# Altium PCB PCB3.PcbDoc
Units mil, origin at the board's own origin, x right, y up, seen from the top; angles counter-clockwise.
Board outline 1574.8 x 984.25 mil, 2 copper layers (Top Layer, Bottom Layer); 6 components, 4 nets, 12 pads, 0 vias.
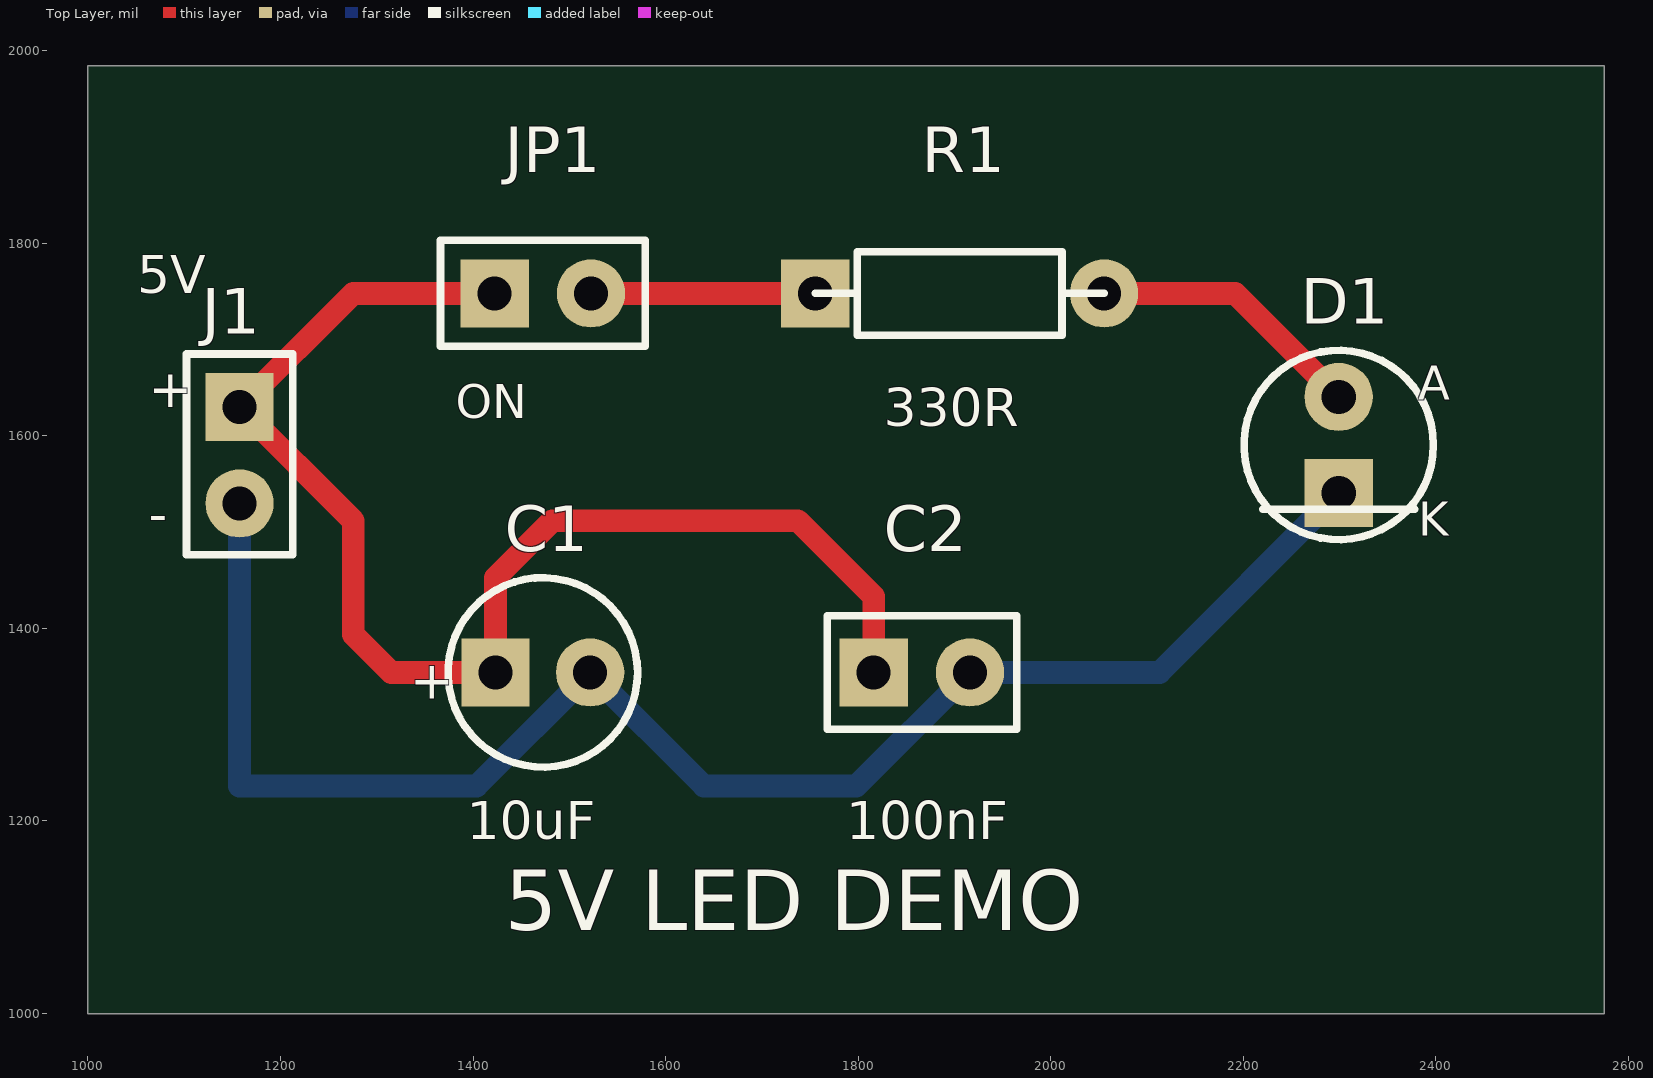
[diagram p0: Top Layer view]
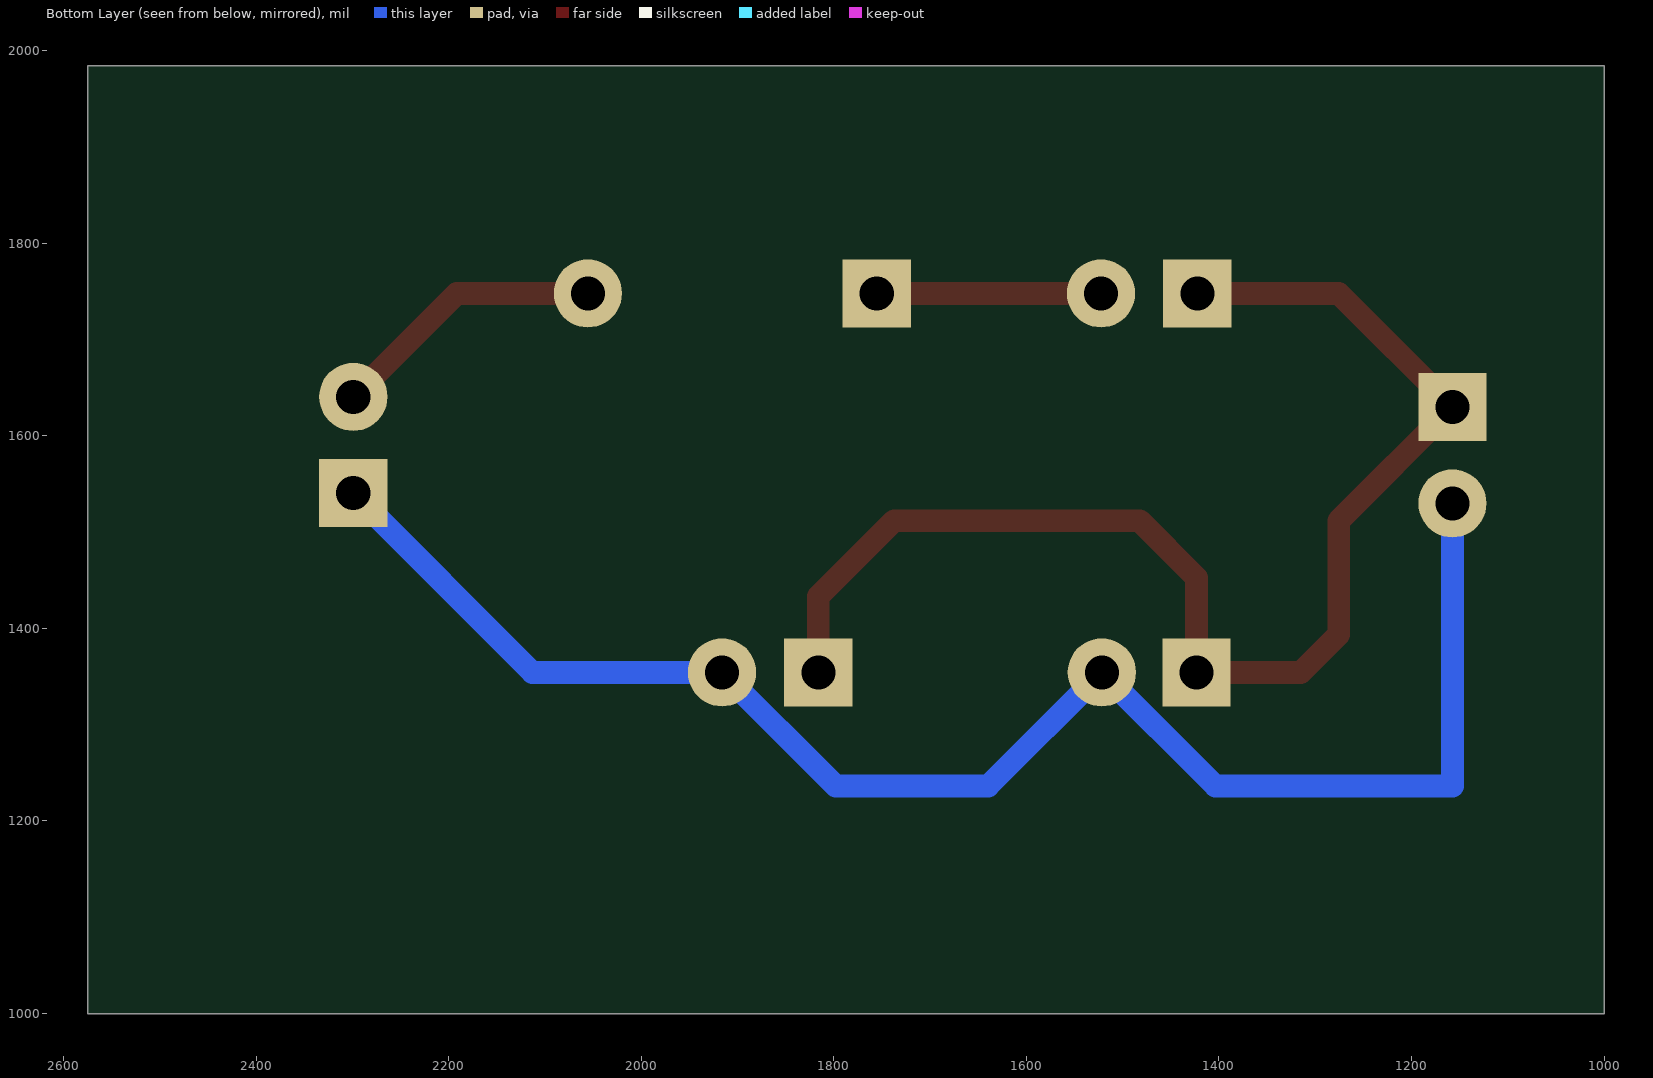
[diagram p1: Bottom Layer view, seen from below]

## Layer stack, top to bottom
Top Solder: solder mask 0.4, Solder Resist, Dk 3.5
Top Layer: signal copper 1.4
Dielectric 1: dielectric 12.6, FR-4, Dk 4.8
Bottom Layer: signal copper 1.4
Bottom Solder: solder mask 0.4, Solder Resist, Dk 3.5

## Board outline
1000,1000 2574.8,1000 2574.8,1984.25 1000,1984.25

## Design rules (kind name [scope] priority, off if disabled: settings)
Clearance [All] p1: gap=10 ignorepadtopadclearanceinfootprint=FALSE except(0: Arc-Hole Track-Hole SMDPad-Hole THPad-Hole Via-Hole Fill-Hole Poly-Hole Region-Hole Text-Hole)
PolygonConnect [All] p1: connectstyle=Relief reliefconductorwidth=10 reliefentries=4 polygonreliefangle="90 Angle" airgapwidth=10
RoutingVias [All] p1: holewidth=28 width=50 viastyle="Through Hole" minholewidth=28 minwidth=50 maxholewidth=28 maxwidth=50
SolderMaskExpansion [All] p1: expansion=4 istentingtop=FALSE
Width [All] p1: maxlimit=10 minlimit=10 preferedwidth=10
30 further rules are at their usual default settings.

## Components (designator, comment, footprint, x,y, rotation, side; value= is the part's Value field where it differs from the comment)
C1 "10uF" CAP_RADIAL_D5_P2.5 1472.44,1354.33 r0 top
C2 "100nF" CAP_DISC_P2.54 1866.14,1354.33 r0 top
D1 "RED LED" LED_D5_P2.54 2299.21,1590.55 r0 top
J1 "5V IN" HDR_1X02_P2.54#1 1157.48,1579.92 r0 top
JP1 "ON/OFF" HDR_1X02_P2.54#2 1472.44,1748.03 r0 top
R1 "330R" R_AXIAL_P7.62 1905.51,1748.03 r0 top

## Footprints (in the part's own frame and the unit in brackets; to place one, negate y for a bottom-side part, rotate by r counter-clockwise, add the part's x,y. Pads: shape width x height; smd on the part's side, far side on the other; paste and mask are expansions set on the pad)
CAP_DISC_P2.54 [mm]
  rect 1.8x1.8 hole 0.9: 1(-1.27,0)
  round 1.8 hole 0.9: 2(1.27,0)
  silkscreen extent -2.5,-1.5 2.5,1.5
CAP_RADIAL_D5_P2.5 [mm]
  rect 1.8x1.8 hole 0.9: 1(-1.25,0)
  round 1.8 hole 0.9: 2(1.25,0)
  silkscreen extent -2.5,-2.5 2.5,2.5
HDR_1X02_P2.54#1 [mm]
  rect 1.8x1.8 hole 0.9: 1(0,1.27)
  round 1.8 hole 0.9: 2(0,-1.27)
  silkscreen extent -1.4,-2.63 1.4,2.67
HDR_1X02_P2.54#2 [mm]
  rect 1.8x1.8 hole 0.9: 1(-1.27,0)
  round 1.8 hole 0.9: 2(1.27,0)
  silkscreen extent -2.7,-1.4 2.7,1.4
LED_D5_P2.54 [mm]
  rect 1.8x1.8 hole 0.9: 1(0,-1.27)
  round 1.8 hole 0.9: 2(0,1.27)
  silkscreen extent -2.5,-2.5 2.5,2.5
R_AXIAL_P7.62 [mm]
  rect 1.8x1.8 hole 0.9: 1(-3.81,0)
  round 1.8 hole 0.9: 2(3.81,0)
  silkscreen extent -3.81,-1.1 3.81,1.1

## Nets (pads, with @x,y where several pads share a name; then routed paths per layer and width w, separated by ;. In a path a pad name is that pad's centre, name@x,y a point inside that pad or via, vN(x,y) a via of type N, cw(c..) or ccw(c..) an arc to the next point about the centre after c; other vN are vias at no path point)
+5V: C1.1 C2.1 J1.1 JP1.1 | length 1390.1
  Top Layer w23.62: JP1.1 1275.59,1748.03 J1.1 1275.59,1511.81 1275.59,1393.7 1314.96,1354.33 C1.1 1423.23,1452.76 1482.28,1511.81 1737.4,1511.81 1816.14,1433.07 C2.1
GND: C1.2 C2.2 D1.1 J1.2 | length 1659.3
  Bottom Layer w23.62: J1.2 1157.48,1236.22 1403.54,1236.22 C1.2 1639.76,1236.22 1798.03,1236.22 C2.2 2112.99,1354.33 D1.1
LED_A: D1.2 R1.2 | length 288.2
  Top Layer w23.62: R1.2 2191.73,1748.03 D1.2
VSW: JP1.2 R1.1 | length 233.1
  Top Layer w23.62: JP1.2 R1.1

## Silkscreen, mask and mechanical layers (free items; w line width, h text height)
Top Overlay:
  text "5V" at 1051.18,1748.03 h39.37
  text "A" at 2381.89,1637.8 h35.43
  text "+" at 1062.99,1629.92 h39.37
  text "ON" at 1381.89,1618.11 h35.43
  text "330R" at 1826.77,1610.24 h39.37
  text "-" at 1062.99,1500 h39.37
  text "K" at 2381.89,1496.06 h35.43
  text "+" at 1334.65,1326.77 h39.37
  text "10uF" at 1393.7,1181.1 h39.37
  text "100nF" at 1787.4,1181.1 h39.37
  text "5V LED DEMO" at 1433.07,1086.61 h62.99
Mechanical 1:
  the board outline again, w3.94